# Altium PCB PCB8.PcbDoc (part 2 of 2)
Units mm, origin at the board's own origin, x right, y up, seen from the top; angles counter-clockwise.
Board outline 100 x 100 mm, 2 copper layers (Top Layer, Bottom Layer); 151 components, 157 nets, 624 pads, 195 vias.
Unrouted connection lines stored in the file: 31.
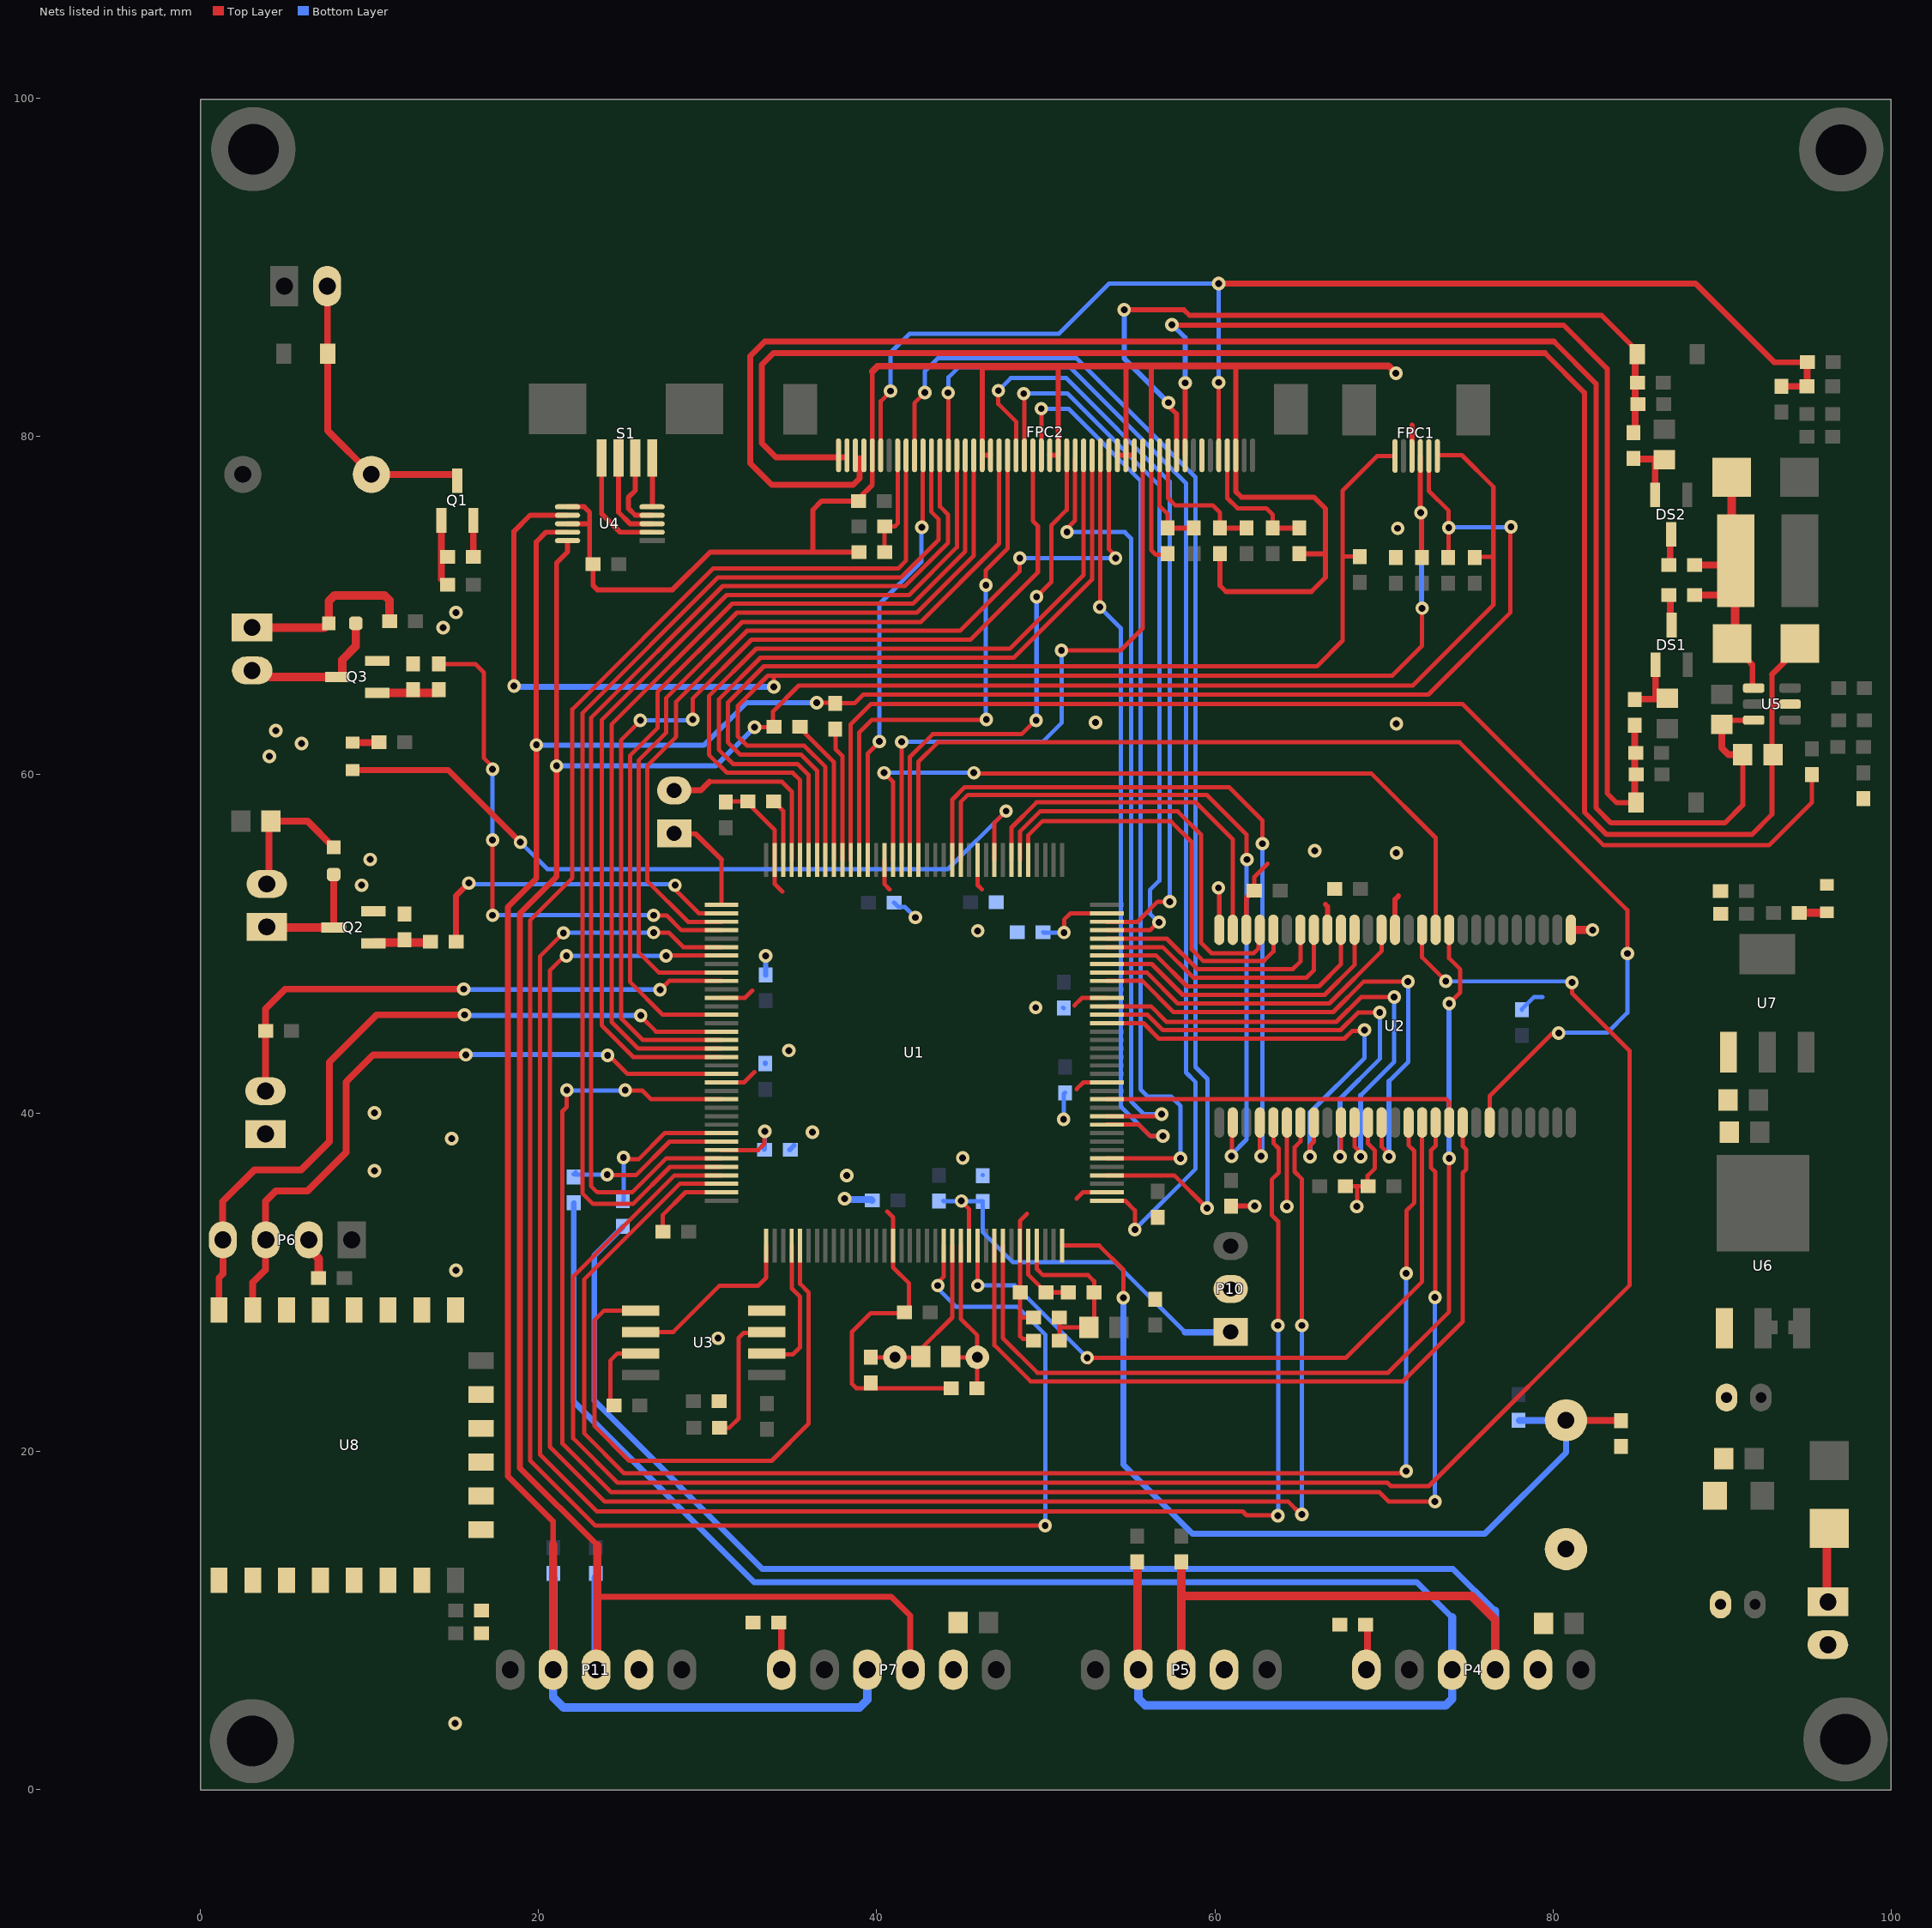
[diagram p2: the nets of this part, all layers, seen from the top]

## Via types
v1: diameter 0.8, hole 0.4, Top Layer to Bottom Layer, 179 vias
v2: diameter 0.8, hole 0.4, Top Layer to Bottom Layer, tented both sides, 16 vias

## Nets (pads, with @x,y where several pads share a name; then routed paths per layer and width w, separated by ;. In a path a pad name is that pad's centre, name@x,y a point inside that pad or via, vN(x,y) a via of type N, cw(c..) or ccw(c..) an arc to the next point about the centre after c; other vN are vias at no path point) (continued)
FMC_BA1: U1.90 U2.21 | length 70.2
  Top Layer w0.254: U1.90@42.465,54.954 42.465,60.771 43.612,61.918 74.48,61.918 84.404,51.994 v1(84.404,49.428) ; U2.21@76.263,39.429 76.263,41.001 79.985,44.722 v1(80.34,44.722)
  Bottom Layer w0.254: v1(80.34,44.722) 80.353,44.735 83.216,44.735 84.404,45.923 v1(84.404,49.428)
FMC_D0: U1.85 U2.2 | length 42.9
  Top Layer w0.254: U1.85@44.965,54.954 44.965,58.387 45.394,58.816 59.515,58.816 61.874,56.457 v1@61.874,54.984 ; v1(60.985,37.433) 61.024,37.471 61.024,39.39 U2.2@61.063,39.429
  Bottom Layer w0.254: v1(60.985,37.433) 60.985,37.534 61.874,38.423 v1@61.874,54.984
  other v1: 61.9,54.984
FMC_D1: U1.86 U2.4 | length 44.8
  Top Layer w0.254: U1.86@44.465,54.954 44.465,58.529 45.206,59.27 60.839,59.27 62.814,57.295 v1(62.814,55.924) ; v1@62.663,37.434 U2.4@62.663,39.429
  Bottom Layer w0.254: v1@62.814,37.534 v1(62.814,55.924)
  other v1: 62.739,37.434
FMC_D2: U1.114 U2.5 | length 109.6
  Top Layer w0.254: v1(21.463,50.641) 20.091,49.269 20.091,48.101 20.091,19.78 23.444,16.427 61.646,16.427 61.874,16.198 v1@63.348,16.198 ; v1(26.797,50.666) 27.693,50.666 28.553,49.806 30.813,49.806 U1.114@30.815,49.804 ; U2.5@63.463,39.429 63.463,38.206 63.779,37.89 63.779,36.467 63.361,36.049 63.361,33.965 63.754,33.572 v1@63.754,27.4
  Bottom Layer w0.254: v1(21.463,50.641) 21.476,50.653 26.784,50.653 v1(26.797,50.666) ; v1@63.741,16.185 v1@63.741,27.412
  other v1: 63.729,16.173 63.729,27.425
FMC_D3: U1.115 U2.7 | length 108.3
  Top Layer w0.254: v1@21.641,49.396 20.676,48.431 20.676,20.237 23.913,17 64.349,17 v1@65.075,16.274 ; v1(27.534,49.294) 27.541,49.302 30.813,49.302 U1.115@30.815,49.304 ; U2.7@65.063,39.429 65.063,38.31 64.717,37.964 64.717,36.521 65.139,36.098 v1@65.139,27.4
  Bottom Layer w0.254: v1(21.641,49.294) v1(27.534,49.294) ; v1(65.151,16.249) v1(65.151,27.425)
FMC_D4: U1.58 U2.8 | length 27
  Top Layer w0.254: U1.58@53.615,45.304 55.781,45.304 56.693,44.392 67.666,44.392 68.123,44.849 v1@69.088,44.849 ; v1(65.634,37.407) 65.634,38.068 65.863,38.297 U2.8@65.863,39.429
  Bottom Layer w0.254: 65.634,40.023 68.859,43.249 v1(68.859,44.907)
  Bottom Layer w0.3: v1(65.634,37.407) 65.634,40.023
FMC_D5: U1.59 U2.10 | length 28.2
  Top Layer w0.254: U1.59@53.615,45.804 56.018,45.804 56.921,44.9 67.437,44.9 68.469,45.932 v1(69.758,45.932) ; v1@67.463,37.687 U2.10@67.463,39.429
  Bottom Layer w0.254: 67.412,40.836 69.763,43.187 69.763,45.927 v1(69.758,45.932)
  Bottom Layer w0.3: v1(67.412,37.407) 67.412,40.836
FMC_D6: U1.60 U2.11 | length 30.4
  Top Layer w0.254: U1.60@53.615,46.304 56.229,46.304 57.15,45.383 67.183,45.383 68.656,46.856 v1(70.612,46.856) ; U2.11@68.263,39.429 68.275,39.416 68.275,37.991 68.656,37.61 v1@68.656,37.407
  Bottom Layer w0.254: 68.631,41.039 70.612,43.021 v1(70.612,46.856)
  Bottom Layer w0.3: v1(68.631,37.407) 68.631,41.039
FMC_D7: U1.63 U2.13 | length 32.5
  Top Layer w0.254: U1.63@53.615,47.804 55.719,47.804 57.556,45.967 67.005,45.967 68.809,47.77 v1(71.425,47.77) ; U2.13@69.799,39.492 U2.13@69.863,39.429 69.863,38.004 70.307,37.56 v1(70.307,37.407) v1@70.307,37.356
  Bottom Layer w0.254: v1(70.307,37.407) v1@70.32,37.42 ; 70.307,41.878 71.439,43.009 71.439,47.756 v1(71.425,47.77)
  Bottom Layer w0.3: v1(70.307,37.407) 70.307,41.878
FMC_D8: U1.64 U2.42 | length 19.6
  Top Layer w0.254: U1.64@53.615,48.304 55.981,48.304 57.81,46.475 66.777,46.475 69.863,49.561 U2.42@69.863,50.829
FMC_D9: U1.65 U2.44 | length 18.2
  Top Layer w0.254: U1.65@53.615,48.804 56.269,48.804 58.09,46.983 66.497,46.983 68.263,48.749 U2.44@68.263,50.829
FMC_D10: U1.66 U2.45 | length 17.2
  Top Layer w0.254: U1.66@53.615,49.304 56.531,49.304 58.344,47.491 66.167,47.491 67.463,48.787 U2.45@67.463,50.829
FMC_D11: U1.67 U2.47 | length 15.6
  Top Layer w0.254: U1.67@53.615,49.804 56.92,49.804 58.725,47.999 65.43,47.999 65.863,48.431 U2.47@65.863,50.829
FMC_D12: U1.68 U2.48 | length 14.3
  Top Layer w0.254: U1.68@53.615,50.304 57.156,50.304 58.953,48.507 64.618,48.507 65.063,48.952 U2.48@65.063,50.829
FMC_D13: U1.77 U2.50 | length 25
  Top Layer w0.254: U1.77@48.965,54.954 48.967,54.956 48.967,56.427 49.784,57.245 57.404,57.245 58.623,56.025 58.623,49.675 59.306,48.993 62.908,48.993 63.463,49.548 U2.50@63.463,50.829
FMC_D14: U1.78 U2.51 | length 24.8
  Top Layer w0.254: U1.78@48.465,54.954 48.465,56.637 49.657,57.829 57.81,57.829 59.182,56.457 59.182,50.056 59.792,49.447 62.306,49.447 62.597,49.737 62.597,50.763 U2.51@62.663,50.829
FMC_D15: U1.79 U2.53 | length 21.9
  Top Layer w0.254: U1.79@47.965,54.954 47.965,56.873 49.454,58.362 58.877,58.362 61.063,56.177 U2.53@61.063,50.829
FMC_NBL0: U1.142 U2.15 | length 89.9
  Top Layer w0.254: U1.142@30.815,35.804 28.343,35.804 22.682,30.143 22.682,21.05 25.044,18.687 v1@71.12,18.687 ; v1(71.323,30.505) 71.336,30.518 71.336,34.219 71.806,34.689 71.806,37.737 71.463,38.08 U2.15@71.463,39.429
  Bottom Layer w0.254: v1(71.323,18.814) v1(71.323,30.505)
FMC_NBL1: U1.141 U2.39 | length 119.8
  Top Layer w0.254: U1.141@30.815,36.304 28.031,36.304 22.047,30.321 22.047,20.745 24.663,18.129 70.206,18.129 70.409,17.925 72.662,17.925 84.531,29.794 84.531,43.681 81.128,47.085 v1(81.128,47.72) ; U2.39@72.263,50.829 72.263,49.193 v1(73.66,47.796)
  Bottom Layer w0.254: v1(73.66,47.796) v1@81.077,47.77
FMC_SDCKE0: U1.29 U2.37 | length 57.4
  Top Layer w0.254: U1.29@47.465,32.154 47.465,26.671 49.505,24.631 70.249,24.631 73.863,28.245 v1(73.863,37.306) ; v1(73.863,46.475) 74.524,47.135 74.524,48.481 73.863,49.142 U2.37@73.863,50.829
  Bottom Layer w0.3: v1@73.85,37.306 v1@73.85,46.475
FMC_SDCLK: U1.93 U2.38 | length 45
  Top Layer w0.254: v1(40.437,60.115) 40.967,59.585 40.967,54.956 U1.93@40.965,54.954 ; v1@45.745,60.064 69.266,60.064 73.063,56.267 U2.38@73.063,50.829
  Bottom Layer w0.254: v1(40.437,60.115) v1@45.669,60.115 ; v1@45.669,60.191 v1(45.745,60.115)
FMC_SDNCAS: U1.132 U2.17 | length 106.1
  Top Layer w0.254: v1@21.666,41.497 v1(21.666,41.344) 21.666,40.354 21.412,40.1 21.412,20.44 24.282,17.57 69.723,17.57 70.282,17.011 v1(73.025,17.011) ; v1@25.273,41.42 25.375,41.319 26.137,41.319 26.651,40.804 U1.132@30.815,40.804 ; v1@73.037,29.083 73.037,36.506 72.796,36.747 72.796,37.788 73.063,38.055 U2.17@73.063,39.429
  Bottom Layer w0.254: v1@21.666,41.319 v1@25.121,41.319 ; v1(73.025,17.011) v1(73.025,29.083)
  other v1: 25.121,41.344
FMC_SDNE0: U1.28 U2.19 | length 47.9
  Top Layer w0.254: U1.28@46.965,32.154 46.965,26.256 49.098,24.123 71.138,24.123 74.663,27.647 74.663,36.454 74.879,36.671 74.879,37.814 74.663,38.03 U2.19@74.663,39.429
FMC_SDNRAS: U1.49 U2.18 | length 21.5
  Top Layer w0.254: U1.49@53.615,40.804 73.692,40.804 73.863,40.633 U2.18@73.863,39.429
FMC_SDNWE: U1.26 U2.16 | length 41.7
  Top Layer w0.254: v1@45.965,29.787 U1.26@45.965,32.154 ; v1@52.527,25.241 52.807,25.52 67.76,25.52 72.263,30.023 U2.16@72.263,39.429
  Bottom Layer w0.254: v1(45.974,29.787) 48.184,29.787 v1(52.451,25.52)
GND: C1.1 C2.2 C3.1 C4.1 C5.1 C6.1 C7.1 C8.1 C9.1 C10.2 C11.2 C13.1 C15.1 C17.2 C20.2 C21.2 C22.2 C23.2 C24.1 C25.1 C26.1 C27.1 C28.1 C29.1 C30.1 C31.1 C32.1 C33.1 C34.1 C35.1 C36.1 C37.1 C38.1 C39.1 C40.2 C41.2 C50.1 C51.1 C52.1 C53.1 C54.1 C55.1 C56.2 FPC1.3 FPC2.5 FPC2.18 FPC2.19 FPC2.26 FPC2.27 FPC2.34 FPC2.35 FPC2.36 FPC2.38 FPC2.48 L4.2 LED3.2 NTC1.1 P2.1 P4.5 P5.4 P6.2 P7.5 P8.2 P10.2 P11.4 Q1.2 Q2.2 Q3.2 R16.2 R19.2 R20.1 R23.1 R27.1 R35.2 R37.1 R40.1 R44.1 R51.1 U1.16 U1.31 U1.38 U1.51 U1.61 U1.83 U1.94 U1.107 U1.120 U1.130 U2.6 U2.12 U2.28 U2.41 U2.46 U2.52 U2.54 U3.4 U4.6 U4.8 U6.1 U7.1 U8.15 | length 219.8
  Top Layer w0.254: U1.130@30.815,41.804 32.152,41.804 32.766,42.418 ; U1.120@30.815,46.804 32.199,46.804 32.639,47.244 ; C37.1@31.166,58.413 32.284,58.413 33.965,56.732 U1.107@33.965,54.954 33.965,53.538 34.417,53.086 ; U1.94@40.465,54.954 40.465,53.515 40.767,53.213 ; 40.619,34.163 40.965,33.817 U1.16@40.965,32.154 40.967,32.152 40.967,30.857 41.91,29.914 41.91,28.53 C35.1@41.553,28.173 ; C35.1@41.553,28.147 39.635,28.147 38.532,27.044 38.532,23.971 38.786,23.716 C20.2@44.399,23.716 ; v1(42.291,51.562) v1@42.291,51.764 ; U1.83@45.965,54.954 45.965,53.476 46.228,53.213 ; 48.895,34.036 48.465,33.606 U1.31@48.465,32.154 48.465,29.404 C22.2@48.488,29.381 48.488,27.908 ; C34.1@49.276,26.536 49.175,26.638 48.637,26.638 48.488,26.786 48.488,27.908 ; C33.1@49.276,27.908 48.488,27.908 ; 51.689,46.355 52.138,46.804 U1.61@53.615,46.804 ; 51.816,34.925 52.195,35.304 U1.38@53.615,35.304 ; 51.816,41.402 52.218,41.804 U1.51@53.615,41.804 ; FPC2.38@56.236,78.896 56.236,73.297 56.515,73.018 57.15,73.018 R27.1@57.201,73.069 ; C13.1@56.324,33.813 C13.1@56.324,33.82 ; C3.1@62.332,53.155 62.332,53.95 63.119,54.737 ; v1(62.357,34.486) v1@62.374,34.469 ; v1(64.263,34.461) U2.6@64.263,39.429 ; C6.1@67.716,35.654 68.428,35.654 ; v1@68.402,34.486 68.428,34.512 68.428,35.654 ; U2.12@69.063,39.429 69.063,38.169 69.469,37.763 69.469,36.721 69.037,36.29 69.037,35.68 C5.1@69.063,35.655 68.428,35.654
  Top Layer w0.3: U4.8@21.706,74.847 23.012,74.847 ; U4.6@21.706,75.847 22.692,75.847 23.012,75.526 23.012,74.847 ; C2.2@38.913,76.193 36.747,76.193 36.22,75.667 36.22,73.17 ; R35.2@38.938,73.17 36.22,73.17 ; C2.2@38.989,76.244 38.989,76.396 39.736,77.143 FPC2.5@39.736,78.896 39.736,83.856 ; 46.236,84.125 FPC2.18@46.236,78.896 FPC2.19@46.736,78.896 ; FPC2.26@50.236,78.896 FPC2.27@50.736,78.896 50.736,84.125 ; FPC2.34@54.236,78.896 FPC2.35@54.736,78.896 ; 54.736,84.176 54.736,84.169 FPC2.35@54.736,78.896 ; FPC2.36@55.236,78.896 FPC2.35@54.736,78.896 ; FPC2.38@56.236,78.896 56.236,84.176 ; U2.54@60.263,50.829 v1@60.263,53.308 ; R19.2@60.3,73.069 60.3,71.189 60.655,70.834 65.71,70.834 66.548,71.672 66.548,75.736 65.862,76.422 61.57,76.422 61.236,76.755 FPC2.48@61.236,78.896 61.236,84.176 ; C8.1@60.96,34.486 v1(62.357,34.486) ; U2.52@61.863,50.829 61.863,52.699 C3.1@62.319,53.155 ; R16.2@64.999,73.069 66.396,73.069 ; 66.548,52.324 66.663,52.209 U2.46@66.663,50.829 ; U2.41@70.663,50.829 70.663,52.629 70.866,52.832 ; v1@70.701,55.334 v1(70.739,55.372) ; FPC1.3@71.661,78.857 71.661,80.678 ; 23.012,74.847 23.012,72.662 C11.2@23.216,72.459 23.216,71.196 23.47,70.942 27.915,70.942 30.143,73.17 36.22,73.17
  Top Layer w0.4: R23.1@16.129,72.891 16.134,72.896 16.134,75.038 Q1.2@16.139,75.043 ; 39.736,83.856 40.049,84.169 54.736,84.169 54.812,84.169 ; 46.236,84.125 50.736,84.125 ; 54.736,84.176 56.236,84.176 61.236,84.176 70.282,84.176 v1(70.714,83.744)
  Top Layer w0.5: P6.2@6.401,32.487 6.401,31.967 6.985,31.383 C52.1@6.985,30.226 ; U2.28@81.063,50.829 81.068,50.824 82.342,50.824 v1(82.347,50.818)
  Bottom Layer w0.254: C31.1@41.021,52.444 41.28,52.185 41.668,52.185 v1(42.291,51.562) ; v1(45.085,37.338) v1@45.269,37.338 ; C21.2@46.279,36.315 C21.2@46.279,36.328 ; C39.1@51.022,46.228 C39.1@51.054,46.196 ; v1(51.054,39.624) 51.054,41.116 C30.1@51.13,41.192 ; v1(62.357,34.486) v1@62.37,34.473 ; v1@64.25,34.473 v1(64.263,34.461) ; C7.1@78.156,46.094 78.156,46.132 78.887,46.863 79.375,46.863
  Bottom Layer w0.3: C38.1@33.401,42.919 C38.1@33.401,42.957 ; C15.1@33.426,48.151 v1(33.426,49.294) ; v1@34.664,43.554 v1(34.798,43.688) ; R20.1@34.849,37.814 R20.1@35.105,38.07
  Bottom Layer w0.4: v1@15.062,30.632 v1(15.113,30.683) ; v1(38.1,34.925) 38.154,34.871 39.671,34.871 C9.1@39.726,34.816
  other v1: 15.062,3.886 30.607,26.67 68.402,34.461 38.227,36.29 36.195,38.862 49.403,46.228 45.974,50.768 60.212,53.308 65.913,55.499 70.739,63.017 52.949,63.087
  other v2: 10.287,36.576 14.859,38.481 10.287,40.005 9.525,53.467 10.033,54.991 4.064,61.087 5.969,61.849 4.445,62.611 14.351,68.707 15.113,69.596 70.815,74.574
GT911_RST: FPC1.1 R2.2 U1.102 | length 65.5
  Top Layer w0.254: U1.102@36.465,54.954 36.465,60.251 35.535,61.182 31.928,61.182 31.191,61.918 31.191,64.28 33.332,66.421 66.047,66.421 67.564,67.938 67.564,72.916 R2.2@68.682,72.916 ; 67.564,72.967 67.564,76.803 69.618,78.857 FPC1.1@70.661,78.857 ; R2.2@68.529,72.939 R2.2@68.682,72.939
I2C1_SCL: P4.4 P5.3 R21.2 R42.2 | length 103.5
  Top Layer w0.5: R42.2@58.014,13.437 58.014,8.28 58.014,11.43 75.184,11.43 76.581,10.033 P4.4@76.581,7.061 P4.4@76.632,7.01
  Bottom Layer w0.254: R21.2@24.968,33.244 R21.2@24.968,33.282
  Bottom Layer w0.35: R21.2@24.968,33.244 23.292,31.568 23.292,22.962 33.223,13.03 74.092,13.03 76.581,10.541
  Bottom Layer w0.5: P5.3@57.988,7.087 P5.3@58.014,7.061 ; P4.4@76.581,7.061 76.581,10.541
I2C1_SDA: P4.3 P5.2 R25.2 R41.2 | length 100.9
  Top Layer w0.5: R41.2@55.397,13.437 55.436,13.398 55.436,7.099 P5.2@55.474,7.061
  Bottom Layer w0.254: R25.2@22.073,34.689 22.073,34.639 R25.2@22.123,34.689
  Bottom Layer w0.35: R25.2@22.073,34.639 22.073,22.911 32.741,12.243 71.958,12.243 74.041,10.16
  Bottom Layer w0.5: P5.2@55.461,7.074 P5.2@55.474,7.061 55.474,5.359 55.88,4.953 73.66,4.953 74.041,5.334 P4.3@74.041,7.061 74.041,10.16
I2C3_SCL: FPC1.6 P7.4 P11.3 R4.2 R9.2 R46.2 U4.10 | length 170.3
  Top Layer w0.254: v1@21.057,60.648 v1@21.184,60.521 ; U4.10@21.539,73.826 21.56,73.847 U4.10@21.706,73.847 ; v1(32.766,62.807) 33.909,62.807 R9.2@33.934,62.833 ; R9.2@34.138,62.883 33.858,62.883 33.858,63.747 35.382,65.271 36.703,65.271 71.711,65.278 76.479,70.046 76.479,77.031 74.611,78.9 73.233,78.9 73.211,78.878 FPC1.6@73.211,78.857 ; R4.2@75.387,72.84 75.438,72.891 76.429,72.891
  Top Layer w0.3: v1(21.057,60.521) 21.057,60.648 21.057,72.535 21.706,73.185 U4.10@21.706,73.847
  Top Layer w0.35: v1(21.057,60.521) 21.057,53.968 18.898,51.809 18.898,18.992 23.47,14.42 ; 23.47,11.379 40.869,11.379 41.986,10.262 P7.4@41.986,7.061
  Top Layer w0.5: P11.3@23.393,7.01 23.419,7.036 P11.3@23.393,7.061 23.47,7.137 23.47,11.379 23.47,14.42
  Bottom Layer w0.254: v1@20.98,60.521 v1(21.057,60.521)
  Bottom Layer w0.3: v1(21.057,60.521) 30.48,60.521 v1(32.766,62.807)
  Bottom Layer w0.5: R46.2@23.368,12.497 23.381,12.484 23.381,7.074 P11.3@23.393,7.061
I2C3_SDA: FPC1.5 P7.3 P11.2 R3.2 R31.1 R45.2 U4.9 | length 174.6
  Top Layer w0.254: v1(36.449,64.255) 37.465,64.255 37.49,64.28 R31.1@37.541,64.23 ; R31.1@37.567,64.23 38.684,64.23 39.199,64.745 72.637,64.745 77.47,69.578 v1@77.47,74.669 ; FPC1.5@72.661,78.857 72.661,76.786 73.838,75.609 v1(73.838,74.618) 73.838,72.883 73.804,72.849 R3.2@73.812,72.84
  Top Layer w0.3: v1(19.863,61.766) 19.863,73.78 20.43,74.347 U4.9@21.706,74.347
  Top Layer w0.35: v1(19.863,61.766) 19.863,53.866 18.186,52.19 18.186,18.51 20.853,15.843 20.853,14.453
  Top Layer w0.5: P11.2@20.853,7.061 20.853,14.453
  Bottom Layer w0.254: v1@73.914,74.644 v1@77.521,74.644
  Bottom Layer w0.3: v1@19.863,61.74 29.769,61.74 32.283,64.255 v1(36.449,64.255)
  Bottom Layer w0.5: R45.2@20.879,12.497 20.866,12.484 20.866,7.074 P11.2@20.853,7.061 20.853,5.436 21.463,4.826 38.989,4.826 39.446,5.283 P7.3@39.446,7.061
  other v1: 77.521,74.669
KEY: P2.2 R38.2 U1.118 | length 32.5
  Top Layer w0.254: v1@27.191,47.275 27.72,47.804 U1.118@30.815,47.804
  Top Layer w0.4: P2.2@3.835,41.293 3.835,46.152 5.004,47.32 v1(15.57,47.32)
  Bottom Layer w0.3: v1@15.57,47.313 v1(27.178,47.288)
LED: LED1.2 U1.81 | length 45.7
  Top Layer w0.254: U1.81@46.965,54.954 46.965,57.169 v1(47.65,57.854)
  Top Layer w0.35: LED1.2@8.992,60.274 14.656,60.274 v1(18.923,56.007)
  Bottom Layer w0.254: v1(18.923,56.007) 20.52,54.41 44.206,54.41 v1(47.65,57.854)
Light: R36.1 U1.110 | length 19.5
  Top Layer w0.254: v1(28.067,53.467) 28.21,53.324 28.21,53.07 29.476,51.804 U1.110@30.815,51.804
  Top Layer w0.35: R36.1@15.113,50.216 15.113,52.832 v1(15.875,53.594)
  Bottom Layer w0.254: v1(15.875,53.594) 15.938,53.53 28.003,53.53 v1(28.067,53.467)
Light2: R50.1 U1.112 | length 31.3
  Top Layer w0.254: R50.1@14.097,66.548 16.256,66.548 16.764,66.04 16.764,60.981 17.272,60.473 v2(17.272,60.325) ; v2(17.272,51.689) v2(17.272,56.134) ; v2(26.797,51.689) 26.816,51.67 27.578,51.67 28.444,50.804 U1.112@30.815,50.804
  Bottom Layer w0.254: v2(17.272,51.689) v2(26.797,51.689) ; v2(17.272,56.134) v2(17.272,60.325)
LTDC_B2: FPC2.17 U1.122 | length 51.8
  Top Layer w0.254: U1.122@30.815,45.804 27.341,45.804 25.4,47.745 25.4,61.131 27.026,62.756 27.026,64.89 31.725,69.589 42.367,69.589 45.736,72.958 FPC2.17@45.736,78.642
LTDC_B3: FPC2.16 U1.126 | length 55.4
  Top Layer w0.254: U1.126@30.815,43.804 25.887,43.804 24.308,45.383 24.308,62.985 31.445,70.122 42.139,70.122 45.236,73.22 FPC2.16@45.236,78.642
LTDC_B4: FPC2.15 U1.127 | length 56.4
  Top Layer w0.254: U1.127@30.815,43.304 25.599,43.304 23.724,45.18 23.724,63.239 31.115,70.63 41.91,70.63 44.736,73.457 FPC2.15@44.736,78.642
LTDC_B5: FPC2.14 U1.37 | length 70.7
  Top Layer w0.254: v1(44.221,82.594) 44.229,82.586 44.229,78.904 FPC2.14@44.236,78.896 ; U1.37@53.615,34.804 54.699,34.804 55.27,34.232 v1(55.27,33.096)
  Bottom Layer w0.254: v1@44.247,82.568 44.247,83.508 44.831,84.092 51.442,84.092 58.293,77.241 58.293,42.386 58.866,41.813 58.866,36.692 v1(55.27,33.096)
LTDC_B6: FPC2.13 U1.139 | length 66.9
  Top Layer w0.254: U1.139@30.815,37.304 27.532,37.304 25.527,35.299 23.47,35.299 23.089,35.68 23.089,63.366 30.886,71.164 41.656,71.164 44.221,73.729 44.221,75.378 43.736,75.863 FPC2.13@43.736,78.642
LTDC_B7: FPC2.12 U1.140 | length 68
  Top Layer w0.254: U1.140@30.815,36.804 27.769,36.804 25.578,34.613 23.216,34.613 22.581,35.248 22.581,63.645 30.607,71.672 41.427,71.672 43.663,73.907 43.663,75.114 43.236,75.541 FPC2.12@43.236,78.642
LTDC_CLK: FPC2.37 U1.92 | length 36.5
  Top Layer w0.254: U1.92@41.465,54.954 v1@41.465,61.74 ; v1@50.952,67.354 54.432,67.354 55.736,68.658 FPC2.37@55.736,78.642
  Bottom Layer w0.254: v1@41.351,62.071 v1(41.478,61.944) 49.809,61.944 50.927,63.061 v1(50.927,67.354)
LTDC_DE: FPC2.9 U1.22 | length 128.6
  Top Layer w0.254: FPC2.9@41.736,78.642 41.736,72.666 41.275,72.205 30.328,72.205 21.996,63.874 21.996,53.892 19.507,51.403 19.507,19.424 23.343,15.589 v1(49.962,15.589) ; v1@43.434,29.787 43.965,30.318 U1.22@43.965,32.154
  Bottom Layer w0.254: v1@43.434,29.787 44.679,28.543 48.311,28.543 49.962,26.892 v1(49.962,15.589) v1@49.962,15.512
  other v1: 43.612,29.787
LTDC_G2: FPC2.25 U1.42 | length 56.7
  Top Layer w0.254: v1(49.733,81.654) 49.735,81.652 FPC2.25@49.736,78.896 FPC2.25@49.736,78.896 ; U1.42@53.615,37.304 v1@58.038,37.305
  Bottom Layer w0.254: v1(49.733,81.654) 51.34,81.654 55.601,77.394 55.601,41.395 56.032,40.963 57.411,40.963 57.963,40.411 v1(57.963,37.313)
LTDC_G3: FPC2.24 U1.125 | length 59.2
  Top Layer w0.254: v1(26.01,63.214) 26.01,63.188 24.867,62.045 24.867,45.611 26.174,44.304 U1.125@30.815,44.304 ; v1(29.108,63.264) 29.108,64.509 32.588,67.989 45.542,67.989 49.53,71.977 49.53,74.72 49.236,75.014 FPC2.24@49.236,78.642
  Bottom Layer w0.254: v1(26.01,63.214) v1@29.108,63.214
LTDC_G4: FPC2.23 U1.69 | length 43.4
  Top Layer w0.254: v1(48.692,82.543) 48.727,82.507 48.727,78.905 FPC2.23@48.736,78.896 ; U1.69@53.615,50.804 56.17,50.804 v1@56.439,51.072
  Bottom Layer w0.254: v1@48.768,82.568 51.264,82.568 56.718,77.114 56.718,53.739 56.159,53.181 56.159,51.784 56.667,51.276 v1(56.693,51.276) v1@56.974,51.276
LTDC_G5: FPC2.22 U1.70 | length 46.3
  Top Layer w0.254: v1(47.193,82.721) 47.193,81.933 48.236,80.89 FPC2.22@48.236,78.896 ; U1.70@53.615,51.304 55.426,51.304 56.617,52.495 v1(57.328,52.495)
  Bottom Layer w0.254: v1(47.193,82.721) 47.93,83.457 51.213,83.457 57.328,77.343 v1(57.328,52.495)
LTDC_G6: FPC2.21 U1.97 | length 31.3
  Top Layer w0.254: U1.97@38.965,54.954 38.965,61.231 38.964,61.232 38.964,62.502 39.7,63.239 v1@46.406,63.239 ; v1(46.457,71.215) 46.457,72.104 47.736,73.383 FPC2.21@47.736,78.642
  Bottom Layer w0.254: v1(46.457,71.215) 46.457,63.214 v1@46.507,63.163
  other v1: 46.482,63.264
LTDC_G7: FPC2.20 U1.117 | length 49.6
  Top Layer w0.254: U1.117@30.815,48.304 27.102,48.304 25.908,49.498 25.908,60.851 27.534,62.477 27.534,64.534 32.029,69.03 42.596,69.03 47.236,73.671 FPC2.20@47.236,78.642
LTDC_HSYNC: FPC2.11 U1.96 | length 24.4
  Top Layer w0.254: U1.96@39.465,54.954 39.467,54.956 39.467,61.253 v1@40.183,61.969 ; v1(42.672,74.644) 42.727,74.699 42.727,77.872 ; FPC2.11@42.727,78.888 FPC2.11@42.736,78.896
  Bottom Layer w0.254: v1(40.157,61.969) 40.157,70.097 42.634,72.573 42.634,74.682 v1(42.672,74.644)
LTDC_R2: FPC2.33 U1.111 | length 52.7
  Top Layer w0.254: U1.111@30.815,51.304 28.833,51.304 26.416,53.721 26.416,60.521 28.118,62.223 28.118,64.306 32.334,68.522 44.934,68.522 48.463,72.052 v1(48.463,72.815) 48.489,72.815 v1@48.666,72.993 ; FPC2.33@53.736,78.642 53.736,73.333 54.153,72.916 v1@54.153,72.815
  Bottom Layer w0.254: v1@48.692,72.815 v1(54.127,72.815)
LTDC_R3: FPC2.32 U1.46 | length 45.6
  Top Layer w0.254: v1(53.188,69.919) 53.227,69.959 FPC2.32@53.227,78.634 ; FPC2.32@53.227,78.888 FPC2.32@53.236,78.896 ; U1.46@53.615,39.304 55.507,39.304 56.185,38.626 v1(56.921,38.626)
  Bottom Layer w0.254: v1(53.188,69.919) 54.432,68.675 54.432,40.379 56.185,38.626 v1(56.921,38.626)
LTDC_R4: FPC2.31 U1.103 | length 46
  Top Layer w0.254: U1.103@35.965,54.954 35.965,59.989 35.319,60.635 31.509,60.635 30.658,61.486 30.658,64.458 33.122,66.922 48.108,66.922 52.736,71.551 FPC2.31@52.736,78.642
LTDC_R5: FPC2.30 U1.104 | length 46.2
  Top Layer w0.254: U1.104@35.465,54.954 35.465,59.677 35.027,60.115 31.14,60.115 30.074,61.182 30.074,64.661 32.868,67.455 47.879,67.455 52.236,71.813 FPC2.30@52.236,78.642
LTDC_R6: FPC2.29 U1.47 | length 47.1
  Top Layer w0.254: v1(51.257,74.364) 51.257,74.566 51.736,75.045 FPC2.29@51.736,78.642 ; U1.47@53.615,39.804 53.617,39.806 v1@56.806,39.806
  Bottom Layer w0.254: v1(51.257,74.364) 54.661,74.364 ; 54.686,74.364 54.661,74.364 ; v1(56.845,39.922) 55.804,39.922 55.042,40.684 55.042,73.983 54.661,74.364
LTDC_R7: FPC2.28 U1.91 | length 30.8
  Top Layer w0.254: U1.91@41.965,54.954 41.965,61.059 43.307,62.401 48.565,62.401 v1@49.428,63.264 ; v1(49.454,70.529) 50.317,71.392 50.317,74.745 51.236,75.664 FPC2.28@51.236,78.642
  Bottom Layer w0.254: v1@49.454,63.061 v1(49.454,70.529)
  other v1: 49.428,63.214
LTDC_RST: FPC2.44
LTDC_VSYNC: FPC2.10 U1.40 | length 74.7
  Top Layer w0.254: FPC2.10@42.236,78.896 42.227,78.905 42.227,81.978 v1(42.85,82.601) ; U1.40@53.615,36.304 57.6,36.304 v1(59.538,34.366)
  Bottom Layer w0.254: v1(42.85,82.601) 42.85,83.871 43.612,84.633 51.816,84.633 58.852,77.597 58.852,42.716 59.563,42.005 v1@59.563,34.366
MISO: U1.4 U3.2 | length 8.4
  Top Layer w0.254: U3.2@33.496,25.774 33.547,25.723 35.052,25.723 35.458,26.13 35.458,29.127 34.965,29.62 U1.4@34.965,32.154
MOSI: U1.5 U3.5 | length 34.4
  Top Layer w0.254: U3.5@26.041,28.314 23.876,28.314 23.292,27.73 23.292,21.481 25.349,19.424 33.782,19.424 35.966,21.608 35.966,29.381 35.465,29.882 U1.5@35.465,32.154
NetBZ1_2: BZ1.2 D2.1 P3.2 Q1.3 | length 17.6
  Top Layer w0.4: P3.2@7.493,88.9 7.508,88.885 7.508,84.92 D2.1@7.523,84.905 7.523,80.344 BZ1.2@10.099,77.768 15.089,77.768 15.189,77.668 Q1.3@15.189,77.393
NetC12_1: C12.1 DS1.3 | length 1.8
  Top Layer w0.4: C12.1@86.868,70.631 86.944,70.554 86.944,68.929 DS1.3@87.02,68.852
NetC12_2: C12.2 C18.1 D1.1 D6.1 L1.2 U5.1 | length 14.3
  Top Layer w0.254: L1.2@90.587,70.631 L1.2@90.783,70.434
  Top Layer w0.35: D1.1@91.592,66.719 91.806,66.505 U5.1@91.806,65.203
  Top Layer w0.4: C12.2@88.392,70.631 L1.2@90.587,70.631 ; C18.1@88.392,72.408 90.556,72.408 L1.2@90.81,72.662 L1.2@90.58,72.892
  Top Layer w0.5: L1.2@90.58,72.892 D6.1@90.58,77.59 ; D1.1@90.783,67.76 L1.2@90.783,70.434
NetC17_1: C17.1 R15.2 U1.23 Y1.1 | length 10.3
  Top Layer w0.254: C17.1@39.65,25.545 Y1.1@41.07,25.545 42.545,25.545 R15.2@42.596,25.596 ; R15.2@42.596,25.647 42.596,26.028 44.467,27.899 44.467,32.152 U1.23@44.465,32.154
NetC18_2: C18.2 DS2.3 | length 1.9
  Top Layer w0.4: C18.2@86.868,72.408 86.931,72.472 86.931,74.148 DS2.3@86.995,74.212
NetC20_1: C20.1 R15.1 U1.24 Y1.2 | length 10.4
  Top Layer w0.254: R15.1@44.374,25.596 44.425,25.545 Y1.2@45.95,25.545 45.95,23.744 C20.1@45.923,23.716 ; U1.24@44.965,32.154 44.967,32.152 44.967,27.823 45.95,26.839 Y1.2@45.95,25.647
NetC40_1: C40.1 U1.71 | length 4.7
  Top Layer w0.254: v1(51.079,50.666) 51.079,51.428 51.455,51.804 U1.71@53.615,51.804
  Bottom Layer w0.254: C40.1@49.835,50.692 49.86,50.666 v1(51.079,50.666)
NetC41_1: C41.1 U1.106 | length 3.7
  Top Layer w0.254: C41.1@33.909,58.413 34.465,57.857 U1.106@34.465,54.954
NetC43_2: C43.2 DS1.1 R28.2 | length 3.4
  Top Layer w0.4: R28.2@84.836,64.44 84.874,64.478 86.131,64.478 86.07,64.539 DS1.1@86.07,66.502
NetC44_2: C44.2 DS2.2 R29.1 | length 3.4
  Top Layer w0.4: R29.1@84.76,78.708 84.791,78.677 85.979,78.677 86.045,78.611 DS2.2@86.045,76.562
NetD3_1: D3.1 P8.1 | length 4.4
  Top Layer w0.5: D3.1@96.215,15.421 96.215,11.125 P8.1@96.266,11.074
NetFPC2_8: FPC2.8 R7.2 R35.1 | length 6.1
  Top Layer w0.254: R35.1@40.462,73.221 R7.2@40.462,74.745 ; R7.2@40.462,74.694 41.072,74.694 41.236,74.859 FPC2.8@41.236,78.642
NetFPC2_39: FPC2.39 R24.1 R27.2 | length 6.4
  Top Layer w0.254: FPC2.39@56.736,78.896 56.736,75.896 57.201,75.431 R27.2@57.201,74.593 R27.2@56.965,74.829
  Top Layer w0.3: R27.2@57.201,74.593 R24.1@58.75,74.593
NetFPC2_40: FPC2.40 R17.2 R19.1 | length 8.4
  Top Layer w0.254: FPC2.40@57.236,78.896 57.236,76.361 57.658,75.939 59.868,75.939 60.3,75.507 R19.1@60.3,74.593
  Top Layer w0.3: R19.1@60.3,74.593 R17.2@61.874,74.593
NetFPC2_47: FPC2.47 R11.2 R16.1 | length 8
  Top Layer w0.254: FPC2.47@60.736,78.896 60.736,76.366 61.341,75.761 63.043,75.761 63.424,75.38 R11.2@63.424,74.593
  Top Layer w0.3: R11.2@63.424,74.593 R16.1@64.999,74.593
NetLED1_1: LED1.1 R1.2 | length 1.6
  Top Layer w0.4: LED1.1@8.992,61.9 10.515,61.9 R1.2@10.541,61.925
NetLED2_1: LED2.1 P1.2 R33.1 | length 8.2
  Top Layer w0.4: P1.2@3.912,53.536 4.039,53.663 4.039,57.125 R33.1@4.166,57.252 6.324,57.252 LED2.1@7.874,55.702
NetLED2_2: LED2.2 P1.1 Q2.3 | length 7.1
  Top Layer w0.4: Q2.3@7.849,50.945 Q2.3@7.874,50.971 LED2.2@7.874,54.102
  Top Layer w0.5: P1.1@3.912,50.996 3.937,50.971 Q2.3@7.874,50.971
NetLED3_1: LED3.1 R47.2 | length 1.7
  Top Layer w0.5: R47.2@94.564,51.816 94.59,51.842 96.19,51.842 LED3.1@96.215,51.867
NetLED4_1: LED4.1 P12.1 R49.1 | length 11
  Top Layer w0.5: P12.1@3.048,68.707 7.328,68.707 LED4.1@7.582,68.961 7.582,70.281 7.913,70.612 10.883,70.612 11.176,70.319 R49.1@11.176,69.088
NetLED4_2: LED4.2 P12.2 Q3.3 | length 9
  Top Layer w0.5: P12.2@3.048,66.167 3.734,66.167 4.115,65.786 Q3.3@8.096,65.786 8.332,65.786 8.382,65.836 8.382,66.802 9.182,67.602 LED4.2@9.182,68.961
NetQ1_1: Q1.1 R22.2 R23.2 | length 4
  Top Layer w0.4: Q1.1@14.239,75.043 14.239,71.575 14.567,71.247 R22.2@14.605,71.247
NetQ2_1: Q2.1 R36.2 R37.2 | length 3.5
  Top Layer w0.5: Q2.1@10.224,50.021 10.274,50.071 13.444,50.071 13.589,50.216 R36.2@13.628,50.254
NetQ3_1: Q3.1 R50.2 R51.2 | length 3.7
  Top Layer w0.5: Q3.1@10.446,64.836 13.941,64.836 14.097,64.992 R50.2@14.097,65.024
NetR5_2: R5.2 U3.3 | length 8.2
  Top Layer w0.254: R5.2@30.455,21.38 R5.2@30.709,21.38 31.28,21.38 31.826,21.926 31.826,26.688 32.112,26.974 33.426,26.974 U3.3@33.496,27.044
NetR6_2: R6.2 U3.7 | length 4.7
  Top Layer w0.254: R6.2@24.46,22.701 24.232,22.929 24.232,25.342 24.663,25.774 U3.7@26.041,25.774
NetR9_1: R9.1 U1.100 | length 8.4
  Top Layer w0.254: R9.1@35.611,62.604 37.465,60.75 U1.100@37.465,54.954
NetR12_2: R12.2 U1.98 | length 71.6
  Top Layer w0.254: U1.98@38.465,54.954 38.465,62.994 39.656,64.186 74.651,64.186 83.007,55.829 92.786,55.829 95.326,58.369 R12.2@95.326,60.013
NetR20_2: R20.2 U1.138 | length 4.5
  Top Layer w0.254: U1.138@30.815,37.804 32.985,37.804 33.35,38.169 v1@33.35,38.906
  Bottom Layer w0.254: R20.2@33.325,37.814 33.376,37.864 v1(33.376,38.906)
NetR21_1: R21.1 U1.136 | length 9.4
  Top Layer w0.254: v1@25.019,37.636 v1@25.222,37.433 ; v1@25.222,37.255 25.908,37.255 27.457,38.804 U1.136@30.815,38.804
  Bottom Layer w0.254: R21.1@24.994,34.806 25.019,34.832 v1(25.019,37.356) v1@25.019,37.636
NetR25_1: R25.1 U1.137 | length 9.7
  Top Layer w0.254: v1@24.054,36.493 24.232,36.315 25.756,36.315 27.745,38.304 U1.137@30.815,38.304
  Bottom Layer w0.254: R25.1@22.073,36.366 R25.1@22.2,36.493 ; R25.1@22.2,36.34 v1(24.054,36.34) ; v1@24.054,36.493 v1@24.079,36.493
NetR26_2: R26.2 U1.143 | length 5
  Top Layer w0.254: R26.2@27.33,32.962 27.33,33.953 28.682,35.304 U1.143@30.815,35.304
NetR31_2: R31.2 U1.99 | length 7.9
  Top Layer w0.254: R31.2@37.592,62.706 37.567,62.68 37.567,61.512 37.965,61.114 U1.99@37.965,54.954
NRST: C21.1 P10.1 R18.2 U1.25 | length 24.6
  Top Layer w0.254: v1@45.008,34.698 45.008,34.766 45.465,34.308 U1.25@45.465,32.154
  Bottom Layer w0.254: R18.2@43.942,34.791 43.967,34.766 C21.1@46.279,34.766 46.279,32.937 48.053,31.162 54.098,31.162 58.242,27.019
  Bottom Layer w0.4: 58.242,27.019 P10.1@61.341,27.019
  other v1: 45.008,34.791
P0: U8.12
P2: U8.16
P3: U8.17
P7: U8.4
P11: U8.2
P14: U8.7
P15: U8.1
P16: U8.9
P17: U8.10
P18: U8.11
P20: U8.18
P23: U8.19
P24: U8.20
P31: U8.3
P32: U8.5
P33: U8.6
P34: U8.13
SCK: U1.1 U3.6 | length 10.7
  Top Layer w0.254: U3.6@26.041,27.044 27.965,27.044 30.683,29.762 32.969,29.762 33.465,30.257 U1.1@33.465,32.154
SDO1: P4.1 R40.2 | length 2.8
  Top Layer w0.4: P4.1@68.961,7.061 69.037,7.137 R40.2@69.037,9.804
SDO2: P7.1 R44.2 | length 2.8
  Top Layer w0.4: R44.2@34.187,9.881 R44.2@34.199,9.868 ; R44.2@34.353,9.842 34.353,7.074 P7.1@34.366,7.061
SWCLK: P9.1 U1.109 | length 6.1
  Top Layer w0.254: U1.109@30.813,52.306 30.813,54.981
  Top Layer w0.3: P9.1@28.016,56.533 28.042,56.508 29.286,56.508 30.813,54.981
SWDIO: P9.2 U1.105 | length 12.3
  Top Layer w0.254: P9.2@27.584,58.489 P9.2@27.775,58.489 ; P9.2@27.737,58.438 P9.2@28.194,58.896 ; 30.099,59.581 34.392,59.581 34.965,59.008 U1.105@34.965,54.954
  Top Layer w0.35: P9.2@28.016,59.073 29.591,59.073 30.099,59.581
Temp: C50.2 NTC1.2 R34.2 U1.36 | length 53.3
  Top Layer w0.254: U1.36@50.965,32.154 53.165,32.154 54.585,30.734 v1@54.585,29.362
  Top Layer w0.4: NTC1.2@80.772,21.819 80.785,21.806 84.01,21.806 C50.2@84.023,21.793
  Bottom Layer w0.35: v1(54.585,29.058) 54.585,19.202 58.674,15.113 75.971,15.113 80.772,19.914 NTC1.2@80.772,21.819
  Bottom Layer w0.4: R34.2@78.003,21.793 78.016,21.806 80.759,21.806 NTC1.2@80.772,21.819
TOUCH_INT: FPC1.4 R48.2 U1.101 U4.7 | length 97.9
  Top Layer w0.254: v1(33.909,65.195) 33.909,65.855 ; U1.101@36.965,54.954 36.965,60.463 35.712,61.715 32.334,61.715 31.775,62.274 31.775,64.077 33.553,65.855 33.909,65.855 ; v1(72.263,69.85) 72.263,67.633 70.492,65.862 33.916,65.862 33.909,65.855
  Top Layer w0.3: v1(18.542,65.253) 18.542,74.399 19.49,75.347 U4.7@21.706,75.347 ; FPC1.4@72.161,78.857 72.161,75.533 v1(72.187,75.507) 72.225,75.469 72.225,72.878 R48.2@72.263,72.84
  Bottom Layer w0.3: v1(18.542,65.253) v1@18.6,65.195 ; v1(72.187,75.507) 72.225,75.469 72.225,69.888 v1(72.263,69.85)
  Bottom Layer w0.35: v1@18.6,65.195 v1(33.909,65.195)
USART6_RX: P6.4 U1.124 U8.22 | length 43.8
  Top Layer w0.254: v1(26.035,45.764) 26.035,45.713 26.944,44.804 U1.124@30.815,44.804
  Top Layer w0.4: U8.22@1.086,28.343 1.086,30.245 1.321,30.48 P6.4@1.321,32.487 P6.4@1.321,32.937 ; P6.4@1.295,32.937 1.295,34.747 3.175,36.627 5.944,36.627 7.62,38.303 7.62,43.002 10.414,45.796 v1(15.621,45.796)
  Bottom Layer w0.3: v1@15.621,45.764 v1(26.035,45.764)
USART6_TX: P6.3 U1.129 U8.21 | length 39.9
  Top Layer w0.254: v1@24.206,43.351 25.253,42.304 U1.129@30.815,42.304
  Top Layer w0.4: U8.21@3.086,28.343 3.086,29.972 3.835,30.721 P6.3@3.835,32.367 ; P6.3@3.835,32.817 3.835,34.773 4.445,35.382 6.325,35.382 8.611,37.668 8.611,41.834 10.211,43.434 v1(15.697,43.434) ; P6.3@3.861,32.367 P6.3@3.861,32.487
  Bottom Layer w0.254: v1@24.105,43.452 v1@24.206,43.351
  Bottom Layer w0.3: v1@15.697,43.452 v1@24.105,43.452
  other v1: 24.079,43.402
VCOM: C57.1 FPC2.6 FPC2.46 R30.2 R32.1 | length 77.4
  Top Layer w0.254: FPC2.6@40.236,78.896 40.236,82.088 40.742,82.594 v1@40.843,82.594 ; v1@60.198,89.35 v1@60.496,89.052 ; FPC2.46@60.236,78.896 v1@60.236,82.988
  Top Layer w0.35: v1(60.223,89.052) 60.496,89.052 62.408,89.052 88.443,89.052 93.098,84.397 C57.1@95.047,84.397
  Top Layer w0.4: R30.2@93.523,82.975 R32.1@95.021,82.975 95.034,82.988 95.034,84.385 C57.1@95.047,84.397
  Bottom Layer w0.254: v1(40.818,82.695) 40.818,84.963 41.935,86.081 50.775,86.081 53.746,89.052 v1(60.223,89.052) v1(60.223,83.203)
VDDA: C33.2 C34.2 L2.2 R10.2 U1.33 | length 11.1
  Top Layer w0.254: U1.33@49.465,32.154 49.465,30.773 49.841,30.397 52.502,30.397 52.857,30.041 R10.2@52.857,29.381 52.857,27.628 L2.2@52.553,27.323 50.902,27.323 50.8,27.222 ; C34.2@50.8,26.536 50.8,27.222 ; C33.2@50.8,27.908 50.8,27.222
VGH: C45.1 D4.2 FPC2.41 R29.2 R52.2 | length 46.2
  Top Layer w0.3: v1(54.635,87.503) 58.166,87.503 58.496,87.173 82.88,87.173 84.988,85.065 D4.2@84.988,84.887 ; v1(57.252,82.01) 57.252,81.82 57.736,81.336 FPC2.41@57.736,78.896
  Top Layer w0.4: R29.2@84.76,80.232 84.874,80.346 84.874,84.772 D4.2@84.988,84.887
  Bottom Layer w0.3: v1(54.635,87.503) 54.635,84.626 v1(57.252,82.01)
VGL: C19.1 D5.1 FPC2.42 R28.1 R43.1 | length 66.4
  Top Layer w0.3: v1(57.455,86.614) 57.556,86.614 57.582,86.589 80.638,86.589 83.21,84.016 83.21,58.903 83.769,58.344 84.788,58.344 D5.1@84.836,58.392 ; FPC2.42@58.236,78.896 v1@58.236,83.229
  Top Layer w0.4: D5.1@84.836,58.392 R28.1@84.836,62.916
  Bottom Layer w0.3: v1(57.455,86.614) 57.48,86.614 58.242,85.852 v1@58.242,83.254
  other v1: 58.242,83.178
VLED+: C14.2 D1.2 FPC2.1 FPC2.2 U5.5 | length 108.8
  Top Layer w0.3: 79.527,84.938 81.864,82.601 81.864,57.785 83.185,56.464 91.77,56.464 92.964,57.658 92.964,64.179 ; 92.964,65.935 92.964,64.179 ; U5.5@94.031,64.179 92.964,64.179
  Top Layer w0.35: FPC2.2@38.176,78.784 34.036,78.784 33.198,79.622 33.198,84.252 33.884,84.938 79.527,84.938 ; 92.964,65.935 D1.2@94.789,67.76
VLED-: C14.1 FPC2.3 FPC2.4 R14.1 U5.3 | length 108.5
  Top Layer w0.3: 80.061,85.623 82.55,83.134 82.55,58.039 83.439,57.15 90.17,57.15 91.226,58.206 C14.1@91.226,61.182 ; R14.1@89.992,63.087 90.134,63.229 U5.3@91.881,63.229
  Top Layer w0.35: 38.986,78.733 38.986,77.536 38.608,77.158 33.782,77.158 32.512,78.428 32.512,84.769 33.367,85.623 80.061,85.623
  Top Layer w0.4: R14.1@89.992,63.087 89.992,61.588 90.399,61.182 C14.1@91.226,61.182
VREF+: C22.1 R10.1 U1.32 | length 4.5
  Top Layer w0.254: U1.32@48.965,32.154 48.965,30.428 C22.1@50.012,29.381
  Top Layer w0.3: C22.1@50.012,29.381 R10.1@51.333,29.381
X+: S1.1 U4.2 | length 6.7
  Top Layer w0.3: S1.1@23.721,78.733 23.721,75.434 24.808,74.347 U4.2@26.706,74.347
X-: S1.3 U4.4 | length 4.7
  Top Layer w0.3: S1.3@25.721,78.733 25.721,76.819 25.298,76.396 25.298,75.761 25.713,75.347 U4.4@26.706,75.347
Y+: S1.2 U4.3 | length 5.5
  Top Layer w0.3: S1.2@24.721,78.733 24.721,75.526 25.4,74.847 U4.3@26.706,74.847
Y-: S1.4 U4.5 | length 2.9
  Top Layer w0.3: U4.5@26.706,75.847 26.721,75.847 S1.4@26.721,78.733
pads on no net: FPC1. FPC2.45 FPC2.49 FPC2.50 FPC2.51 FPC2.52 S1.5 S1.6 U1.2 U1.6 U1.7 U1.8 U1.9 U1.18 U1.19 U1.20 U1.21 U1.27 U1.34 U1.35 U1.41 U1.43 U1.44 U1.45 U1.48 U1.73 U1.74 U1.75 U1.76 U1.80 U1.88 U1.113 U1.116 U1.123 U1.128 U2.40 U8.14

## Polygon pours and split planes (outlines as drawn)
GND on Top Layer "GND_L01_P000" (solid, remove dead copper, pour order 0): 0,-0.051 100,-0.051 100,99.949 0,99.949
GND on Bottom Layer "GND_L02_P001" (solid, remove dead copper, pour order 1): 0,-0.051 100,-0.051 100,99.949 0,99.949

## Keep-outs
Keep-Out Layer:
  the board outline again, w0.2

## Other copper
Top Layer:
  text "TOP" at 10.587,96.541 h1.5

## Silkscreen, mask and mechanical layers (free items; w line width, h text height)
Top Overlay:
  lines w0.254: 50,-4.928 50,102.489